# Altium PCB OFP_USM_v1.5.PcbDoc
Units mm, origin at the board's own origin, x right, y up, seen from the top; angles counter-clockwise.
Board outline 45 x 22 mm, 2 copper layers (Top Layer, Bottom Layer), stack 1.57 mm thick; 18 components, 14 nets, 76 pads, 37 vias.
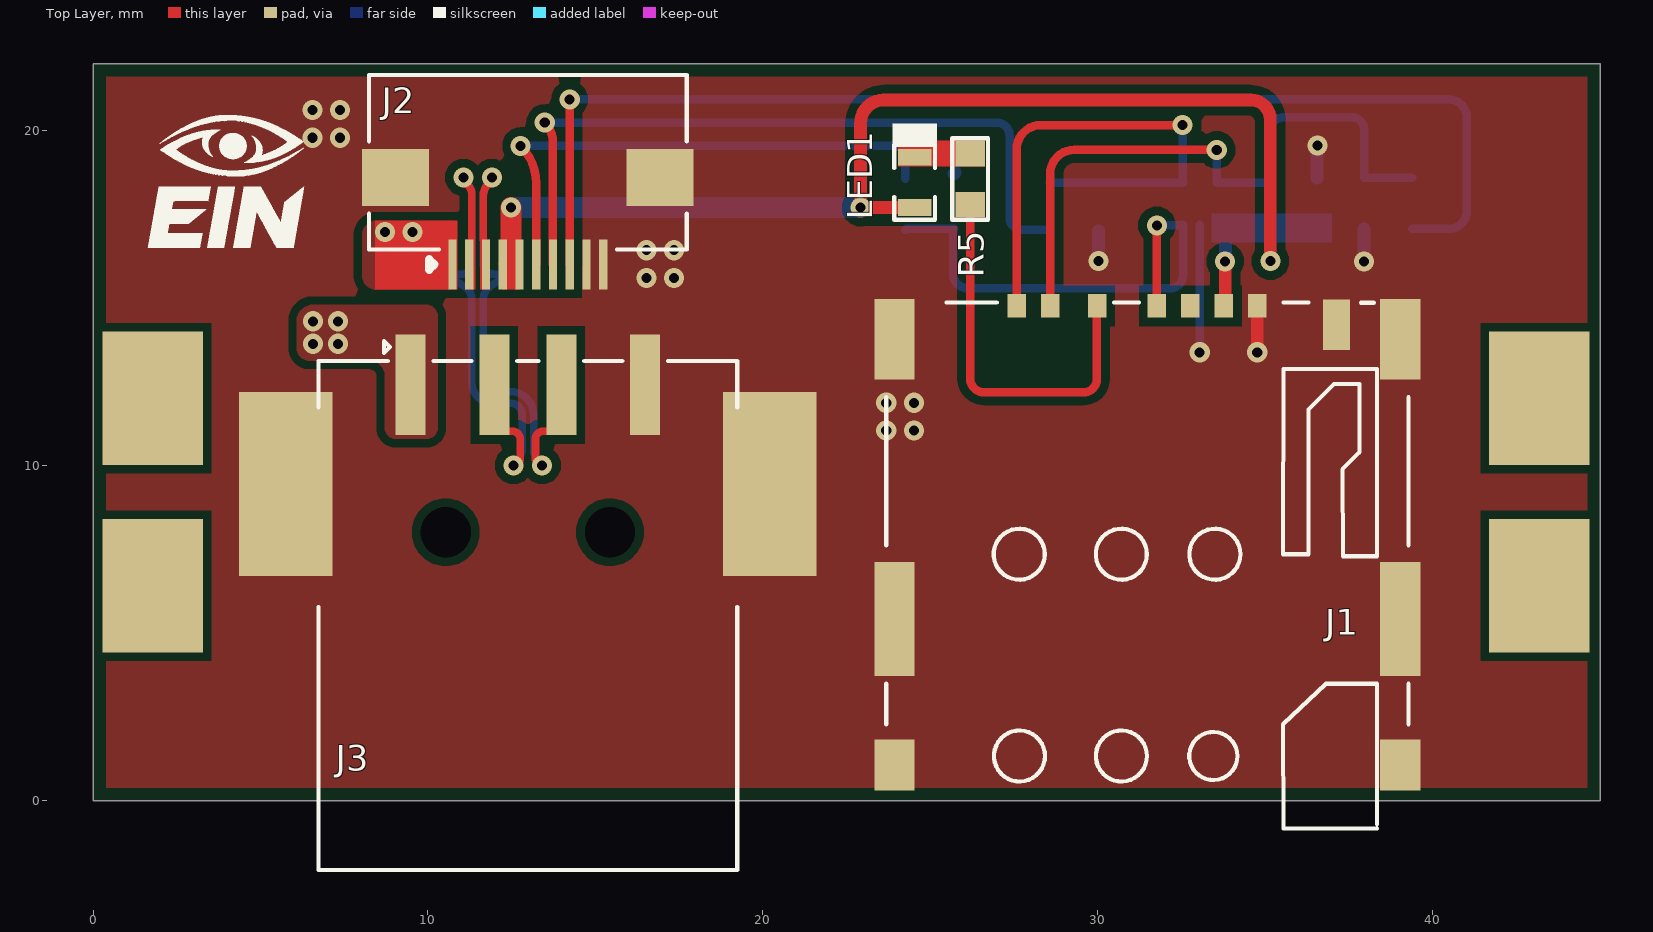
[diagram p0: Top Layer view]
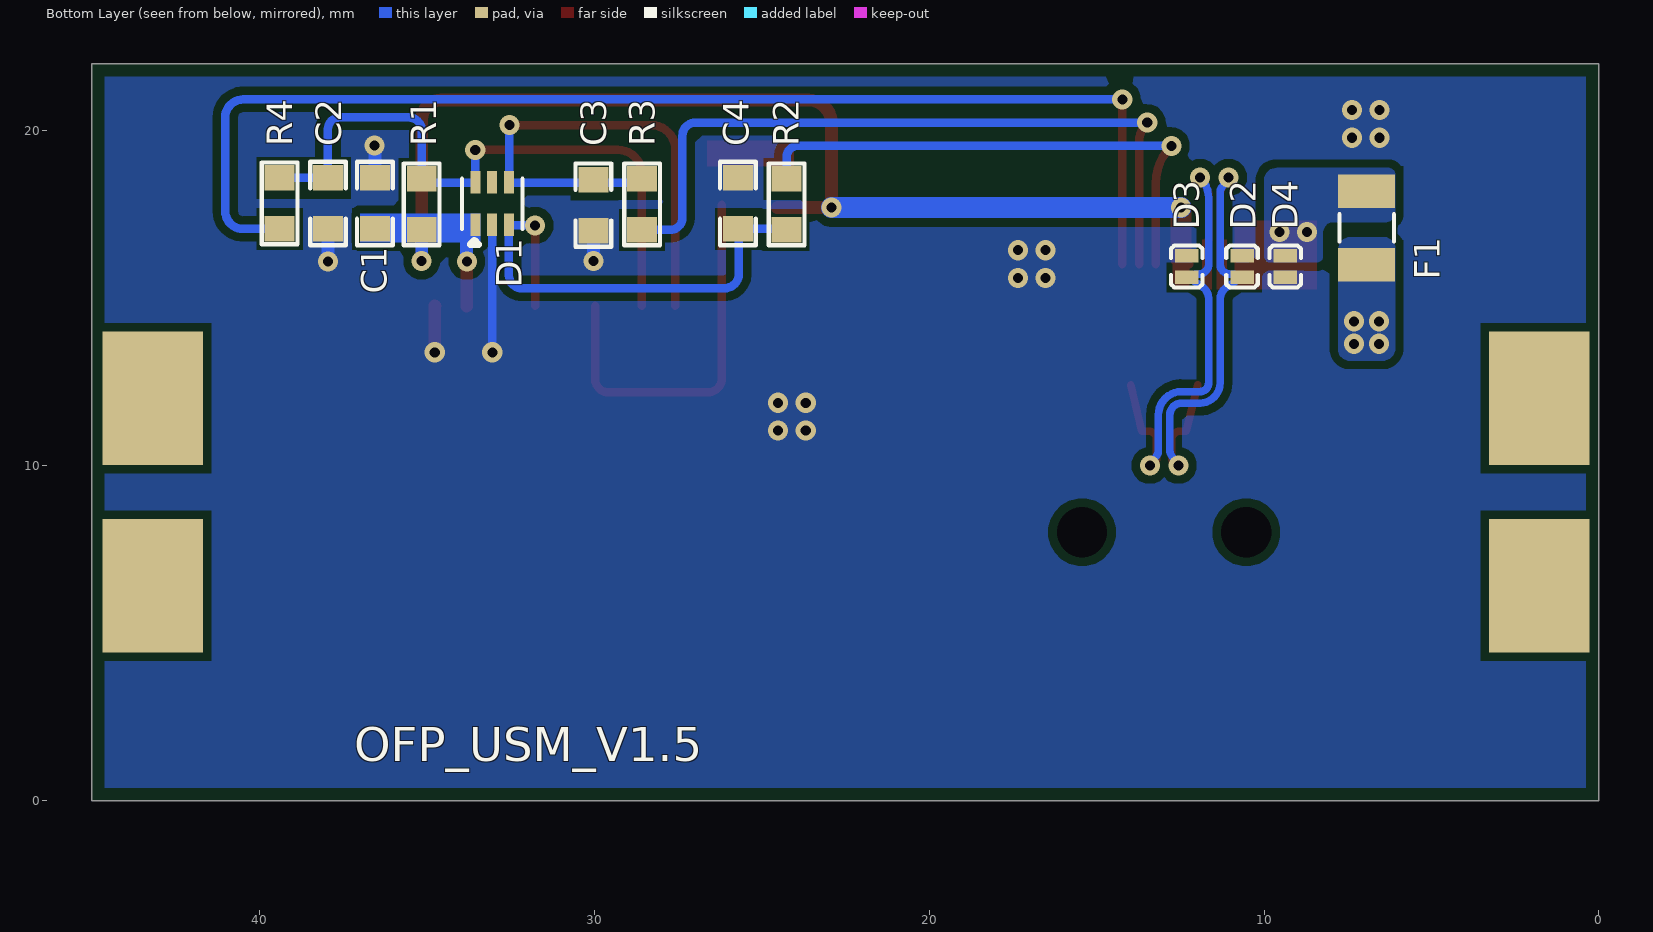
[diagram p1: Bottom Layer view, seen from below]
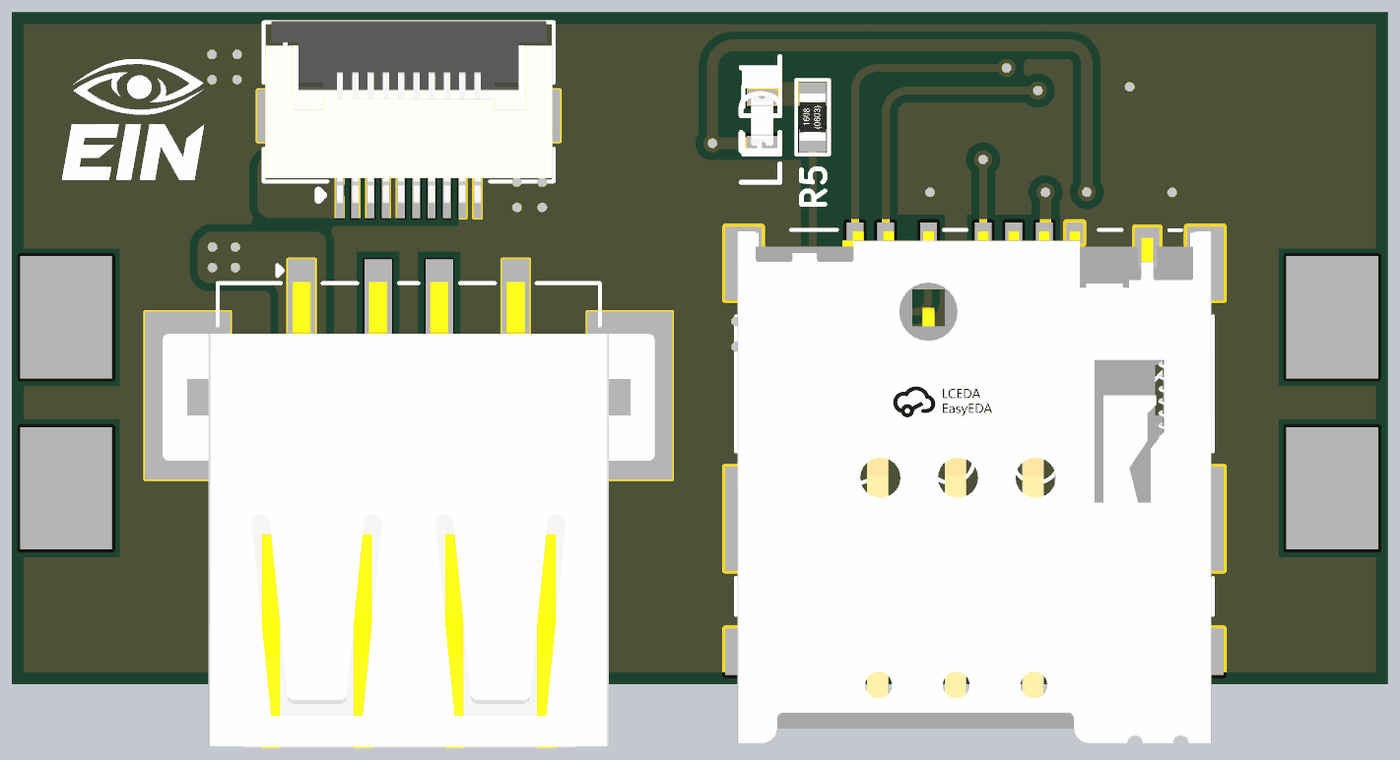
[diagram p2: 3D render of the assembled board from above, using the file's embedded part models]
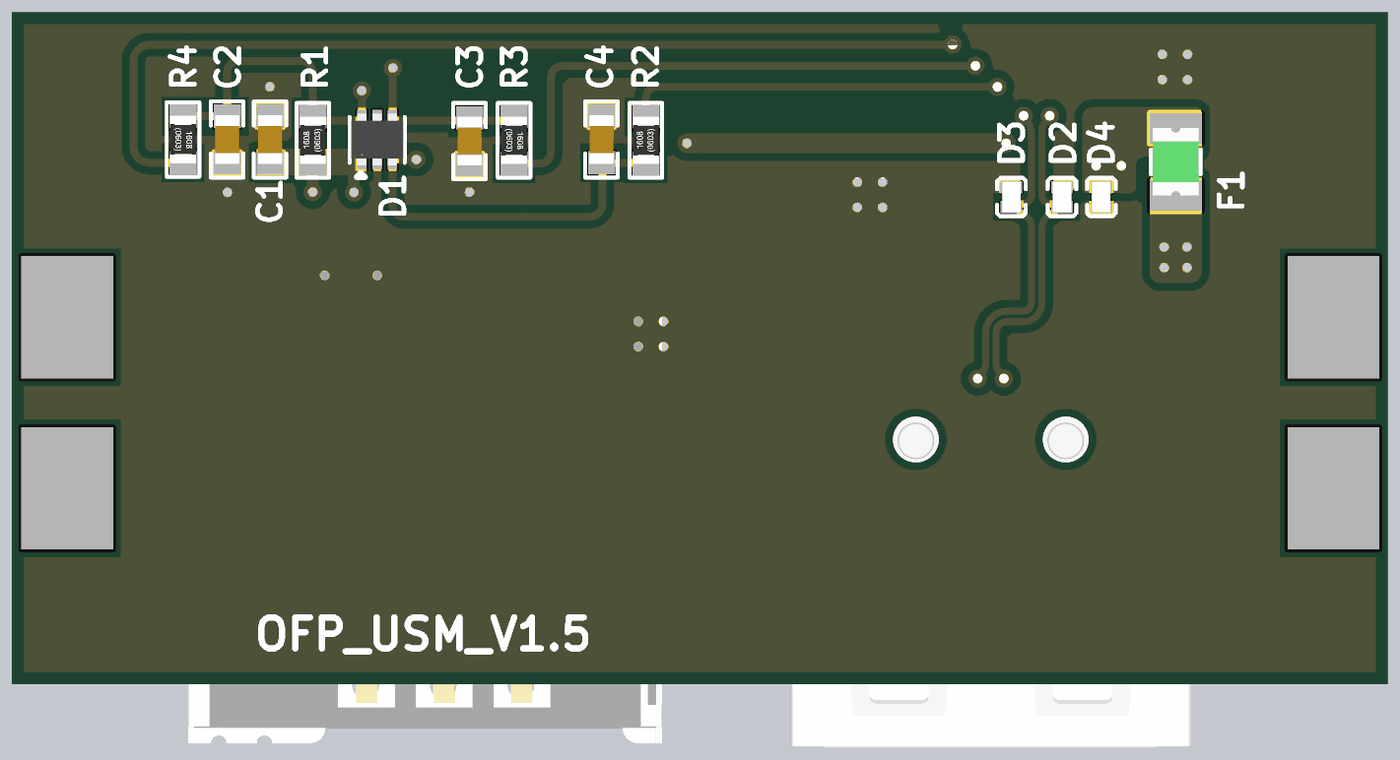
[diagram p3: 3D render of the assembled board from below, using the file's embedded part models]

## Layer stack, top to bottom
Top Solder: solder mask 0.0102, Solder Resist, Dk 3.5
Top Layer: signal copper 0.035
Dielectric 1: dielectric 1.5, FR-4, Dk 4.8
Bottom Layer: signal copper 0.035
Bottom Solder: solder mask 0.0102, Solder Resist, Dk 3.5

## Board outline
0,0 0,22 45,22 45,0

## Design rules (kind name [scope] priority, off if disabled: settings)
BoardOutlineClearance [All] p1: gap=0 ignorepadtopadclearanceinfootprint=FALSE except(0.381: Poly-OutlineEdge)
Clearance DIFF_USB [InDifferentialPairClass('DIFF_USB')] p1: gap=0.254 ignorepadtopadclearanceinfootprint=FALSE except(0.102: Arc-Arc Arc-Track Track-Track; 0.127: Arc-Fill Track-Fill SMDPad-Fill Fill-Fill; 0.152: SMDPad-SMDPad; 0.178: Arc-SMDPad Arc-THPad Track-SMDPad Track-THPad)
Clearance [All] p2: gap=0.254 ignorepadtopadclearanceinfootprint=FALSE except(0.152: SMDPad-SMDPad; 0.178: Arc-Arc Arc-Track Arc-SMDPad Arc-THPad Arc-Fill Track-Track Track-SMDPad Track-THPad Track-Fill SMDPad-Fill Fill-Fill)
ComponentClearance [All] p1: gap=0 collisioncheckmode=3 verticalgap=0 showdistances=FALSE
DiffPairsRouting [InDifferentialPairClass('DIFF_USB')] p1: maxlimit=0.114 minlimit=0.114 mostfreqgap=0.114 toplayer_minwidth=0.229 toplayer_maxwidth=0.229 toplayer_prefwidth=0.229 bottomlayer_minwidth=0.229 bottomlayer_maxwidth=0.229 bottomlayer_prefwidth=0.229 impedanceprofiledriven=TRUE impedanceprofileid={3366D138-F6F0-4418-872E-3D7843BC3837} impedanceprofilevalue=90.000000 maxuncoupledlength=12.7
HoleSize [All] p1: absolutevalues=TRUE maxlimit=25.4 minlimit=0.025 maxpercent=80.000 minpercent=20.000
HoleToHoleClearance [All] p1: gap=0 allowstackedmicrovias=TRUE
MinimumSolderMaskSliver [All] p1: minsoldermaskwidth=0
PolygonConnect [All] p1: connectstyle=Direct reliefconductorwidth=0.254 reliefentries=4 polygonreliefangle="90 Angle" airgapwidth=0.254
RoutingVias [All] p1: holewidth=0.3 width=0.6 viastyle="Through Hole" minholewidth=0.3 minwidth=0.6 maxholewidth=0.7 maxwidth=1.2
ShortCircuit "ShortCircuit - No NET" [InNet('No Net')] p1: allowed=TRUE
SilkToSilkClearance [All] p1: silktosilkclearance=0
SilkToSolderMaskClearance [IsPad] p1: minsilkscreentomaskgap=0 clearancetoexposedcopper=TRUE
SolderMaskExpansion [All] p1: expansion=0.102 istentingtop=FALSE
SupplyNets "Schematic Supply Nets" [InNet('+USIM')] p1: voltage=0.000
SupplyNets "Schematic Supply Nets_45" [InNet('GND')] p2: voltage=0.000
SupplyNets "Schematic Supply Nets_42" [InNet('+5V')] p3: voltage=0.000
Width [All] p1: maxlimit=2.54 minlimit=0.203 preferedwidth=0.381 minimp=50.000000 maximp=50.000000 favimp=50.000000
22 further rules are at their usual default settings.

## Classes and differential pairs
differential pair class DIFF_USB: USB-D
component class USB-SIM-Connector-Sheet: C1 C2 C3 C4 D1 D2 D3 D4 F1 J2 J3 LED1 R1 R2 R3 R4 R5
differential pair USB-D: +USB-D_P -USB-D_N

## Components (designator, comment, footprint, x,y, rotation, side; value= is the part's Value field where it differs from the comment)
C1 "0.1uF" Cap-0603 36.551,17.83 r270 bottom value=100nF
C2 "33pF" Cap-0603 37.951,17.83 r90 bottom
C3 "33pF" Cap-0603 30.025,17.78 r90 bottom
C4 "33pF" Cap-0603 25.711,17.83 r270 bottom
D1 "ESDA6V8AV6" SOT-563 33.047,17.827 r90 bottom
D2 "ESD9B5VL" "DFN1006-2L (Bi-Directional)" 10.657,15.947 r270 bottom
D3 "ESD9B5VL" "DFN1006-2L (Bi-Directional)" 12.309,15.947 r270 bottom
D4 "SLESD5451X" "DFN1006-2L (Bi-Directional)" 9.367,15.947 r90 bottom
F1 "SMD0805B035TF" Fuse-0805 6.934,17.099 r90 bottom
J1 "503960-0696" 5039600696 31.483,7.449 r180 top locked
J2 "HX0.5-10P XJH2.0 043" "HX0.5-10P XJH2.0 043" 12.983,17.308 r180 top
J3 "USB-234-BCW" USB-234-BCW 12.983,10.214 r0 top locked
LED1 "RED" LED-0603 24.533,18.458 r90 top
R1 "15K" Res-0603 35.154,17.805 r270 bottom value=15kR
R2 "22R" Res-0603 24.259,17.805 r270 bottom
R3 "22R" Res-0603 28.573,17.805 r90 bottom
R4 "22R" Res-0603 39.395,17.83 r90 bottom
R5 "680R" Res-0603 26.191,18.56 r270 top

## Footprints (in the part's own frame and the unit in brackets; to place one, negate y for a bottom-side part, rotate by r counter-clockwise, add the part's x,y. Pads: shape width x height; smd on the part's side, far side on the other; paste and mask are expansions set on the pad)
5039600696 [mm]
  rect 0.55x0.7 smd: C1(-2.285,-7.322) C2(-0.285,-7.322) C3(3.905,-7.322) C4(1.5,-7.322) C5(-3.28,-7.322) C6(-1.285,-7.322) C7(2.905,-7.322)
  rect 0.8x1.5 smd: C8(-5.65,-6.757)
  rect 1.2x1.524 smd: C9(-7.55,6.382) C9(7.55,6.382)
  rect 1.2x3.4 smd: C9(-7.55,2.022) C9(7.55,2.022)
  rect 1.2x2.4 smd: C9(-7.55,-6.328) C9(7.55,-6.328)
  silkscreen extent -7.8,-7.43 7.8,8.28, body extent -7.75,-7.37 7.75,9.38, height 1.45
Cap-0603 [mil]
  rect 30x35 smd mask+2.36: 1(-30,0) 2(30,0)
  silkscreen extent -49,-21 49,21, body extent -32,-16 31,16, height 34
"DFN1006-2L (Bi-Directional)" [mm]
  rect 0.4x0.7 smd paste+0 mask+0.051: 1(-0.325,0) 2(0.325,0)
  silkscreen extent -0.63,-0.47 0.63,0.47, body extent -0.5,-0.3 0.5,0.3, height 0.47
Fuse-0805 [mm]
  rect 1x1.7 smd: 1(-1.1,0) 2(1.1,0)
  silkscreen extent -0.41,-0.81 0.41,0.81, body extent -1.1,-0.75 1.1,0.75, height 1.24
"HX0.5-10P XJH2.0 043" [mm]
  rect 0.25x1.5 smd paste+0 mask+0.051: 1(2.25,1.3) 2(1.75,1.3) 3(1.25,1.3) 4(0.75,1.3) 5(0.25,1.3) 6(-0.25,1.3) 7(-0.75,1.3) 8(-1.25,1.3) 9(-1.75,1.3) 10(-2.25,1.3)
  rect 2x1.7 smd paste+0 mask+0.051: MP1(-3.95,-1.3) MP2(3.95,-1.3)
  silkscreen extent -4.74,-4.36 4.74,1.45, body extent -4.71,-4.4 4.7,1.6, height 2.02
LED-0603 [mm]
  rect 0.5x1 smd: 1(-0.75,0) 2(0.75,0)
  silkscreen extent -1.12,-0.66 1.75,0.66, body extent -0.82,-0.37 0.82,0.36, height 0.68
Res-0603 [mil]
  rect 30x35 smd: 1(-30,0) 2(30,0)
  silkscreen extent -48,-21 48,21, body extent -31,-17 31,17, height 18
SOT-563 [mm]
  rect 0.67x0.3 smd mask+0.07: 1(-0.638,0.5) 2(-0.638,0) 3(-0.638,-0.5) 4(0.638,-0.5) 5(0.638,0) 6(0.638,0.5)
  silkscreen extent -1.22,-0.9 0.74,0.9, body extent -0.85,-0.85 0.85,0.85, height 0.61
USB-234-BCW [mm]
  rect 0.9x3 smd paste+0 mask+0.051: 1(-3.5,2.2) 2(-1,2.2) 3(1,2.2) 4(3.5,2.2)
  rect 2.794x5.5 smd paste+0 mask+0.051: S1(-7.228,-0.764) S2(7.228,-0.764)
  round 0 hole 1.5 unplated paste-2539.97: ""(-2.45,-2.2) ""(2.45,-2.2)
  silkscreen extent -6.25,-12.29 6.25,3.51, body extent -8.05,-12.29 8.05,2.96, height 6.82

## Part data
C1: library part GCJ188R71H104KA12D, "CAP CER 0.1UF 50V X7R 0603", Case Code (Imperial)=0603, Case Code (Metric)=1608, Dielectric=X7R, LCSC Part Number=C161115, Manufacturer=Murata, Max Operating Temperature=125°C, Min Operating Temperature=-55°C, Package Quantity=1, Ratings=AEC-Q200, Tolerance=10%, Voltage Rating=50V, Case/Package=0603, ComponentLink1Description=https://datasheet.ciiva.com/135/product-135604.pdf?src-supplier=Digikey, ComponentLink1URL=https://datasheet.ciiva.com/135/product-135604.pdf?src-supplier=Digikey, ComponentLink2Description=https://datasheet.ciiva.com/26889/getdatasheetpartid-369886-26889118.pdf?src-supplier=Verical, ComponentLink2URL=https://datasheet.ciiva.com/26889/getdatasheetpartid-369886-26889118.pdf?src-supplier=Verical, ComponentLink3Description=https://datasheet.ciiva.com/135/s0717e-135605.pdf?src-supplier=Digikey, ComponentLink3URL=https://datasheet.ciiva.com/135/s0717e-135605.pdf?src-supplier=Digikey, ComponentLink4Description=https://datasheet.ciiva.com/135/s0717e-135606.pdf?src-supplier=Digikey, ComponentLink4URL=https://datasheet.ciiva.com/135/s0717e-135606.pdf?src-supplier=Digikey, ComponentLink5Description=https://datasheet.ciiva.com/16440/c03e-16440425.pdf?src-supplier=Future+Electronics, ComponentLink5URL=https://datasheet.ciiva.com/16440/c03e-16440425.pdf?src-supplier=Future+Electronics, Construction=Flat, Depth=0.8mm, Features="Soft Termination", Height=0.8mm, Item Type=Capacitors, Lead Free=5697LeadFree, Length=1.6mm, Manufacturer Part Number=GCJ188R71H104KA12D, Material=4241ConductorMaterial, Mounting Technology="Surface Mount", Packaging="Tape and Reel", Pricing="1=0.13, 10=0.056, 50=0.056, 100=0.036, 1000=0.032, 10000=0.02 (USD)", Radiation Hardening=No, RoHS=Yes, RoHS Compliant=Yes, Series=GCJ, Stock=342536, Supplier=Mouser, Termination=SMD/SMT, Thickness=0.035inch, Voltage Rating (DC)=50V, Width=0.031inch
C2 C3 C4: library part GCM1885C2A330JA16D, "CAP CER 33PF 100V C0G/NP0 0603", Case Code (Imperial)=0603, Case Code (Metric)=1608, Dielectric=C0G, LCSC Part Number=C126578, Manufacturer=Murata, Max Operating Temperature=125°C, Min Operating Temperature=-55°C, Package Quantity=1, Ratings=AEC-Q200, Tolerance=5%, Voltage Rating=100V, Case/Package=0603, ComponentLink1Description=https://datasheet.ciiva.com/161/product-161815.pdf?src-supplier=Digikey, ComponentLink1URL=https://datasheet.ciiva.com/161/product-161815.pdf?src-supplier=Digikey, ComponentLink2Description=https://datasheet.ciiva.com/161/product-161814.pdf?src-supplier=Digikey, ComponentLink2URL=https://datasheet.ciiva.com/161/product-161814.pdf?src-supplier=Digikey, ComponentLink3Description=https://datasheet.ciiva.com/161/product-161816.pdf?src-supplier=Digikey, ComponentLink3URL=https://datasheet.ciiva.com/161/product-161816.pdf?src-supplier=Digikey, ComponentLink4Description=https://datasheet.ciiva.com/11606/product-11606732.pdf?src-supplier=Avnet, ComponentLink4URL=https://datasheet.ciiva.com/11606/product-11606732.pdf?src-supplier=Avnet, Construction=Flat, Depth=0.8mm, Height=0.8mm, Item Type=Capacitors, Length=1.6mm, Manufacturer Part Number=GCM1885C2A330JA16D, Mounting Technology="Surface Mount", Packaging="Tape and Reel", Pricing="1=0.1, 10=0.03, 50=0.03, 100=0.022, 1000=0.017, 10000=0.011 (USD)", Radiation Hardening=No, RoHS=Yes, RoHS Compliant=Yes, Series=GCM, Stock=24199, Supplier=Mouser, Termination=SMD/SMT, Thickness=0.035inch, Voltage Rating (DC)=100V, Width=0.031inch
D1: "4A 14V 40W 6V Unidirectional 5V SOT-563 ESD and Surge Protection (TVS/ESD) ROHS", LCSC Part Number=C3021131, Manufacturer="TECH PUBLIC", Package=SOT-563, ComponentLink1Description=LCSC, ComponentLink1URL=https://www.lcsc.com/product-detail/ESD-and-Surge-Protection-TVS-ESD_TECH-PUBLIC-ESDA6V8AV6_C3021131.html?s_z=n_ESDA6V8AV6, Item Type=(TVS/ESD), Manufacturer Part Number=ESDA6V8AV6
D2 D3: "3A 35W 12V 5.6V Bidirectional 5V DFN1006 ESD and Surge Protection (TVS/ESD) ROHS", LCSC Part Number=C2827544, Manufacturer="TECH PUBLIC", Package=DFN1006, ComponentLink1Description=LCSC, ComponentLink1URL=https://www.lcsc.com/product-detail/ESD-and-Surge-Protection-TVS-ESD_TECH-PUBLIC-ESD9B5VL_C2827544.html?s_z=n_ESD9B5VL, Item Type=(TVS/ESD), Manufacturer Part Number=ESD9B5VL
D4: "60W 5.6V Bidirectional 5V DFN1006 ESD and Surge Protection (TVS/ESD) ROHS", LCSC Part Number=C5185982, Manufacturer="Slkor(SLKORMICRO Elec.)", Package=DFN1006, ComponentLink1Description=LCSC, ComponentLink1URL=https://www.lcsc.com/product-detail/ESD-and-Surge-Protection-TVS-ESD_Slkor-SLKORMICRO-Elec-SLESD5451X_C5185982.html?s_z=n_SLESD5451X, Item Type=TVS/ESD, Manufacturer Part Number=SLESD5451X
F1: "6V 350mA 100A 750mA 0805 Resettable Fuses ROHS", LCSC Part Number=C269103, Manufacturer=Brightking, Package=0805, ComponentLink1Description=LCSC, ComponentLink1URL=https://www.lcsc.com/product-detail/Resettable-Fuses_Brightking-SMD0805B035TF_C269103.html?s_z=n_SMD0805B035TF, Item Type="Resettable Fuses", Manufacturer Part Number=SMD0805B035TF
J1: "CONN MICRO SIMM PUSH-PUSH R/A", Current Rating=500mA, LCSC Part Number=C132719, Manufacturer=Molex, Max Operating Temperature=85°C, Min Operating Temperature=-25°C, Voltage Rating=10V, ComponentLink1Description=http://datasheet.octopart.com/5039600696-Molex-datasheet-148167723.pdf?src-supplier=Rs, ComponentLink1URL=http://datasheet.octopart.com/5039600696-Molex-datasheet-148167723.pdf?src-supplier=Rs, ComponentLink2Description=http://datasheet.octopart.com/5039600696-Molex-datasheet-148167723.pdf?src-supplier=Farnell, ComponentLink2URL=http://datasheet.octopart.com/5039600696-Molex-datasheet-148167723.pdf?src-supplier=Farnell, ComponentLink3Description=http://datasheet.octopart.com/5039600696-Molex-datasheet-148167723.pdf?src-supplier=Avnet, ComponentLink3URL=http://datasheet.octopart.com/5039600696-Molex-datasheet-148167723.pdf?src-supplier=Avnet, ComponentLink4Description=http://datasheet.octopart.com/5039600696-Molex-datasheet-148167723.pdf?src-supplier=Arrow+Electronics, ComponentLink4URL=http://datasheet.octopart.com/5039600696-Molex-datasheet-148167723.pdf?src-supplier=Arrow+Electronics, ComponentLink5Description=http://datasheet.octopart.com/5039600696-Molex-datasheet-148167723.pdf?src-supplier=Onlinecomponents.com, ComponentLink5URL=http://datasheet.octopart.com/5039600696-Molex-datasheet-148167723.pdf?src-supplier=Onlinecomponents.com, ComponentLink6Description=http://datasheet.octopart.com/5039600696-Molex-datasheet-148167723.pdf?src-supplier=Verical, ComponentLink6URL=http://datasheet.octopart.com/5039600696-Molex-datasheet-148167723.pdf?src-supplier=Verical, ComponentLink7Description=http://datasheet.octopart.com/5039600696-Molex-datasheet-148167723.pdf?src-supplier=Electro+Sonic, ComponentLink7URL=http://datasheet.octopart.com/5039600696-Molex-datasheet-148167723.pdf?src-supplier=Electro+Sonic, Contact Material=Nickel,Gold, Contact Plating=Gold, Height=1.5mm, Housing Material="Stainless Steel", Item Type="Memory Connectors", Manufacturer Part Number=503960-0696, Number of Circuits=6, Number of Contacts=8, Plating=Gold, Pricing="1=1.7339, 10=1.4783, 25=1.4697, 50=1.441, 100=1.3312, 250=1.3227, 500=1.2003, 1600=1.1948, 3200=1.1943 (USD)", RoHS=Yes, RoHS Compliant=Yes, Stock=4105, Supplier="Arrow Electronics"
J2: "Flip type 10P Bottom Contact Horizontal attachment 0.5mm SMD,P=0.5mm FFC, FPC (Flat Flexible) Connector Assemblies ROHS", LCSC Part Number=C5691101, Manufacturer=hanxia, Package=SMD,P=0.5mm, ComponentLink1Description=LCSC, ComponentLink1URL=https://www.lcsc.com/product-detail/FFC-FPC-Flat-Flexible-Connector-Assemblies_hanxia-HX0-5-10P-XJH2-0-043_C5691101.html?s_z=n_HX0.5-10P%20XJH2.0%20043, Item Type="FFC/FPC Cable", Manufacturer Part Number="HX0.5-10P XJH2.0 043"
J3: "1.5A USB 2.0 1 Horizontal attachment 4P Female -20℃~+70℃ Type-A SMD USB Connectors ROHS", LCSC Part Number=C720528, Manufacturer=XUNPU, Package=SMD, ComponentLink1Description=LCSC, ComponentLink1URL=https://www.lcsc.com/product-detail/USB-Connectors_XUNPU-USB-234-BCW_C720528.html?s_z=n_USB-234-BCW, Item Type="USB Connector", Manufacturer Part Number=USB-234-BCW
LED1: library part NCD0603R3, "RED LED 0603 Light Emitting Diodes", LCSC Part Number=C3151730, Manufacturer="Foshan NationStar Optoelectronics", Package=0603, ComponentLink1Description=LCSC, ComponentLink1URL=https://www.lcsc.com/product-detail/Light-Emitting-Diodes-LED_Foshan-NationStar-Optoelectronics-NCD0603R3_C3151730.html, Item Type=LED, Manufacturer Part Number=NCD0603R3
R1: library part RC0603FR-0715KL, "RES 15K OHM 1% 1/10W 0603", Case Code (Imperial)=0603, Case Code (Metric)=1608, LCSC Part Number=C114661, Manufacturer=Yageo, Max Operating Temperature=155°C, Max Power Dissipation=100mW, Min Operating Temperature=-55°C, Package Quantity=1, Resistance Tolerance=1%, Resistor Type="Thick Film", Supplier Part Number 1=4083945, Temperature Coefficient=100ppm/°C, Voltage Rating=50V, Case/Package=0603, Category="Chip SMD Resistors", Construction=Rectangular, Depth=0.8mm, Features="Moisture Resistant", Height=0.022inch, Item Type=Resistor, Lead Free="Lead Free", Length=0.063inch, Manufacturer Part Number=RC0603FR-0715KL, Military Standard=Not, Number of Terminations=2, Packaging="Tape and Reel", Pins=2, Power Rating=100mW, Pricing 1="5000=0.00150, 50000=0.00140, 100000=0.00140, 200000=0.00140, 375000=0.00140, 625000=0.00130, 1000000=0.00130, 2000000=0.00120, 3750000=0.00120 (USD)", RoHS=Yes, RoHS Compliant=Yes, Series=RC, Stock 1=13310000, Supplier 1="Future Electronics", Termination=SMD/SMT, Tolerance=1%, Voltage Rating (DC)=50V, Width=0.031inch
R2 R3 R4: library part RC0603FR-0722RL, "RES 22 OHM 1% 1/10W 0603", Case Code (Imperial)=0603, Case Code (Metric)=1608, LCSC Part Number=C107701, Manufacturer=Yageo, Max Operating Temperature=155°C, Max Power Dissipation=100mW, Min Operating Temperature=-55°C, Package Quantity=1, Resistance Tolerance=1%, Resistor Type="Thick Film", Temperature Coefficient=100ppm/°C, Voltage Rating=50V, Case/Package=0603, Category="Chip SMD Resistors", ComponentLink1Description=https://datasheet.ciiva.com/11819/0900766b80f96399-11819285.pdf?src-supplier=RSComponents, ComponentLink1URL=https://datasheet.ciiva.com/11819/0900766b80f96399-11819285.pdf?src-supplier=RSComponents, ComponentLink2Description=https://datasheet.ciiva.com/46395/443971-46395032.pdf?src-supplier=Element14, ComponentLink2URL=https://datasheet.ciiva.com/46395/443971-46395032.pdf?src-supplier=Element14, ComponentLink3Description=https://datasheet.ciiva.com/46440/1868787-46440901.pdf?src-supplier=Element14, ComponentLink3URL=https://datasheet.ciiva.com/46440/1868787-46440901.pdf?src-supplier=Element14, ComponentLink4Description=https://datasheet.ciiva.com/2454/pyu-r-int-thick-7-2454355.pdf?src-supplier=Digi-Key, ComponentLink4URL=https://datasheet.ciiva.com/2454/pyu-r-int-thick-7-2454355.pdf?src-supplier=Digi-Key, ComponentLink5Description=https://datasheet.ciiva.com/2454/pyu-r-int-thick-7-2454356.pdf?src-supplier=Digi-Key, ComponentLink5URL=https://datasheet.ciiva.com/2454/pyu-r-int-thick-7-2454356.pdf?src-supplier=Digi-Key, ComponentLink6Description=https://datasheet.ciiva.com/2454/pyu-r-int-thick-7-2454354.pdf?src-supplier=Digi-Key, ComponentLink6URL=https://datasheet.ciiva.com/2454/pyu-r-int-thick-7-2454354.pdf?src-supplier=Digi-Key, Construction=Rectangular, Depth=0.8mm, Features="Moisture Resistant", Height=0.022inch, Item Type=Resistor, Lead Free="Lead Free", Length=0.063inch, Manufacturer Part Number=RC0603FR-0722RL, Military Standard=Not, Number of Pins=2, Number of Terminations=2, Packaging="Tape and Reel", Power Rating=100mW, Pricing 1="5000=0.00133, 10000=0.00131, 20000=0.00127 (USD)", Reach SVHC Compliant=Yes, Resistance=22R, RoHS=Yes, RoHS Compliant=Yes, Series=RC, Size Code=0603, Stock 1=190000, Supplier 1=Avnet, Supplier Part Number 1=RC0603FR-0722RL, Technology="THICK FILM", Termination=SMD/SMT, Tolerance=1%, Voltage Rating (DC)=50V, Width=0.031inch
R5: library part RC0603FR-07680RL, "RES SMD 680 OHM 1% 1/10W 0603", LCSC Part Number=C112310, Manufacturer=Yageo, Package=0603, ComponentLink4Description=LCSC, ComponentLink4URL=https://www.lcsc.com/product-detail/Chip-Resistor-Surface-Mount_YAGEO-RC0603FR-07680RL_C112310.html, Item Type=Resistor, Manufacturer Part Number=RC0603FR-07680RL

## Free pads (board coordinates)
  rect 3x4 smd: MH1(1.783,6.414) MH2(1.783,12.014) MH3(43.183,12.014) MH4(43.183,6.414)
  rect 3x4 smd far side: MH1(1.783,6.414) MH2(1.783,12.014) MH3(43.183,12.014) MH4(43.183,6.414)

## Via types
v1: diameter 0.6, hole 0.3, Top Layer to Bottom Layer, tented both sides, 37 vias

## Nets (pads, with @x,y where several pads share a name; then routed paths per layer and width w, separated by ;. In a path a pad name is that pad's centre, name@x,y a point inside that pad or via, vN(x,y) a via of type N, cw(c..) or ccw(c..) an arc to the next point about the centre after c; other vN are vias at no path point)
+5V: D4.2 F1.2 J2.1 | length 0
  Top Layer w0.305: J2.1 J2.1@10.733,16.039
  other v1: 8.715,16.972 9.539,16.972
+USIM: C1.2 D1.1 J1.C1 J2.4 J2.5 LED1.1 R1.2 | length 39.2
  Top Layer w0.254: 12.402,16.092 12.494,16.184
  Top Layer w0.381: LED1.1 v1(22.919,17.708) 22.919,20.23 cw(c23.608,20.23) 23.608,20.919 34.574,20.919 cw(c34.574,20.339) 35.154,20.339 v1(35.154,16.111) ; v1@33.768,16.103 v1@33.768,16.105 ; J1.C1@33.806,14.771 v1(33.806,16.103)
  Top Layer w0.635: 12.482,16.184 v1(12.482,17.708)
  Bottom Layer w0.254: v1@33.772,16.107 33.768,16.103 v1@33.776,16.103
  Bottom Layer w0.381: v1@33.814,16.103 33.814,17.189 ; v1(35.154,16.111) R1.2
  Bottom Layer w0.508: 33.911,17.189 C1.2@36.328,17.189
  Bottom Layer w0.635: v1(12.482,17.708) v1(22.919,17.708)
GND: C1.1 C2.1 C3.1 C4.1 D1.2 D2.1 D3.1 D4.1 J1.C5 J1.C8 J1.C9 J2.9 J2.10 J2.MP1 J2.MP2 J3.4 J3.S1 J3.S2 | length 8.1
  Top Layer w0.381: J1.C5@34.757,14.765 J1.C5 v1(34.763,13.386)
  Bottom Layer w0.254: v1(33.045,13.386) 33.047,13.386 D1.2 ; C1.1@36.551,18.578 C1.1
  Bottom Layer w0.381: C4.1@25.711,18.721 C4.1@25.746,18.756 ; v1(30.025,16.107) C3.1 ; C1.1 v1@36.551,19.558 ; v1@37.951,16.103 C2.1
  other v1: 23.685,11.054 24.509,11.054 23.685,11.878 24.509,11.878 16.524,15.61 17.348,15.61 37.945,16.103 16.524,16.434 17.348,16.434 36.557,19.558 6.551,19.792 7.375,19.792 6.551,20.616 7.375,20.616
NetC2_2: C2.2 D1.6 J1.C7 R1.1 R4.2 | length 19.4
  Top Layer w0.254: J1.C7 28.578,18.71 cw(c29.299,18.71) 29.299,19.431 v1(33.553,19.431)
  Bottom Layer w0.254: v1@33.547,19.431 D1.6 33.547,18.451 R1.1@35.067,18.451 ; R1.1 35.154,20.016 cw(c35.538,20.016) 35.538,20.4 37.608,20.4 cw(c37.608,20.056) 37.951,20.056 C2.2@37.951,18.618 ; C2.2 R4.2
NetC3_2: C3.2 D1.4 J1.C3 R3.2 | length 15.7
  Top Layer w0.254: J1.C3 27.578,19.446 cw(c28.303,19.446) 27.727,19.887 cw(c28.303,19.446) 27.863,20.022 cw(c28.303,19.446) 28.303,20.171 v1(32.533,20.171)
  Bottom Layer w0.254: R3.2@28.573,18.451 D1.4@32.533,18.451 ; v1(32.533,20.171) 32.54,20.164 32.54,18.472 D1.4 D1.4@32.533,18.451 ; D1.4@32.547,18.451 D1.4@32.533,18.451
NetC4_2: C4.2 D1.3 J1.C2 R2.2 | length 14.8
  Top Layer w0.254: J1.C2 v1(31.768,17.176)
  Bottom Layer w0.254: R2.2 cw(c24.285,17.043) 24.285,17.068 25.679,17.068 C4.2 ccw(c25.711,17.037) 25.679,17.037 25.679,15.731 ccw(c26.111,15.731) 26.111,15.3 32.17,15.3 ccw(c32.17,15.677) 32.547,15.677 D1.3 ; v1@31.775,17.183 D1.3@32.493,17.183
NetF1_1: F1.1 J3.1
  other v1: 6.567,13.64 7.315,13.64 6.567,14.311 7.315,14.311
NetJ1_C4: J1.C4 R5.2 | length 11.6
  Top Layer w0.254: R5.2 26.191,12.607 ccw(c26.606,12.607) 26.606,12.192 29.583,12.192 ccw(c29.583,12.581) 29.972,12.581 J1.C4@29.972,14.771
NetLED1_2: LED1.2 R5.1
USB-D_N: D2.2 J2.2 J3.2 | length 16
  Top Layer w0.229: v1(11.056,18.608) ccw(c11.276,18.608) 11.12,18.452 11.184,18.389 cw(c10.875,18.08) 11.311,18.08 11.311,16.767 cw(c11.177,16.767) 11.272,16.672 ccw(c11.367,16.577) 11.233,16.577 J2.2 ; J3.2 12.319,11.028 12.527,11.028 cw(c12.527,10.8) 12.755,10.8 12.755,10.207 cw(c12.556,10.207) v1(12.556,10.008)
  Bottom Layer w0.229: D2.2@10.657,15.629 10.76,15.562 11.104,15.34 cw(c10.856,14.957) 11.311,14.986 11.311,14.895 11.311,12.47 ccw(c11.912,12.47) 11.912,11.869 12.46,11.869 cw(c12.46,11.517) 12.811,11.517 12.811,11.375 12.811,10.446 cw(c12.583,10.446) 12.77,10.316 v1(12.556,10.008) ; D2.2@10.892,15.714 11.054,15.724 ccw(c11.015,16.02) 11.311,15.982 11.311,16.002 11.311,18.169 ccw(c11.083,18.169) 11.27,18.299 v1(11.056,18.608)
USB-D_P: D3.2 J2.3 J3.3 | length 16.2
  Top Layer w0.229: J2.3 11.733,16.577 ccw(c11.599,16.577) 11.694,16.672 cw(c11.788,16.767) 11.654,16.767 11.654,18.08 cw(c12.091,18.08) 11.782,18.389 11.845,18.452 ccw(c11.69,18.608) v1(11.91,18.608) ; v1(13.41,10.008) cw(c13.41,10.207) 13.21,10.207 13.21,10.8 cw(c13.439,10.8) 13.439,11.028 13.647,11.028 J3.3
  Bottom Layer w0.229: 11.654,14.802 11.654,15.004 ; 11.654,15.982 ccw(c11.95,16.02) 11.912,15.724 D3.2@12.073,15.714 ; 11.654,16.002 11.654,17.991 cw(c12.527,17.991) 11.734,18.355 cw(c12.527,17.991) v1(11.91,18.608) ; D3.2@12.309,15.648 12.206,15.581 11.862,15.359 ccw(c12.11,14.976) 11.654,15.004 ; v1(13.41,10.008) 13.195,10.316 cw(c13.383,10.446) 13.154,10.446 13.154,11.233 13.154,11.517 ccw(c12.46,11.517) 12.46,12.212 11.912,12.212 cw(c11.912,12.47) 11.654,12.47 11.654,15.004
USIM_CLK: J2.7 R3.1 | length 22.3
  Top Layer w0.254: v1(13.487,20.244) cw(c12.895,19.651) 13.733,19.651 J2.7
  Bottom Layer w0.254: v1(13.487,20.244) 26.982,20.244 cw(c26.982,19.856) 27.369,19.856 27.369,17.401 ccw(c27.728,17.402) 27.73,17.043 R3.1
USIM_DATA: J2.8 R4.1 | length 36.9
  Top Layer w0.254: J2.8 v1@14.233,21.077
  Bottom Layer w0.254: v1(14.233,20.936) 40.391,20.936 40.485,20.936 cw(c40.485,20.4) 40.639,20.913 cw(c40.485,20.4) 40.998,20.554 cw(c40.485,20.4) 41.021,20.4 41.021,17.605 cw(c40.485,17.605) 40.921,17.293 cw(c40.485,17.605) 40.796,17.168 cw(c40.485,17.605) 40.485,17.068 R4.1 ; v1@14.233,21.077 v1@14.247,21.063
USIM_RST: J2.6 R2.1 | length 16
  Top Layer w0.254: v1(12.767,19.552) cw(c11.643,18.428) 13.233,18.428 J2.6
  Bottom Layer w0.254: v1(12.767,19.552) 23.923,19.552 cw(c23.923,19.216) 24.259,19.216 R2.1
pads on no net: D1.5 J1.C6 J3.

## Polygon pours and split planes (outlines as drawn)
+5V on Top Layer "NONET_L-01_P-001" (solid, pour order 7): 10.886,15.258 8.473,15.258 cw(c8.473,15.697) 8.033,15.697 8.033,16.884 cw(c8.456,16.884) 8.456,17.308 10.865,17.308 ccw(c10.865,17.328) 10.886,17.328
NetF1_1 on Top Layer "NONET_L-01_P-001" (solid, pour order 6): 8.279,13.133 cw(c8.279,12.697) 8.715,12.697 8.715,11.117 ccw(c9.033,11.117) 9.033,10.8 9.961,10.8 ccw(c9.961,11.125) 10.287,11.125 10.287,14.453 ccw(c9.933,14.453) 9.933,14.807 6.582,14.807 ccw(c6.582,14.311) 6.086,14.311 6.086,13.519 ccw(c6.472,13.519) 6.472,13.133
GND on Top Layer "GND_L01_P001" (solid, remove dead copper, pour order 1): 0,22 45,22 45,0 0,0 0,22
+5V on Bottom Layer "NONET_L-01_P-001" (solid, pour order 5): 9.825,16.07 ccw(c9.825,16.241) 9.997,16.241 9.996,17.444 9.996,18.528 ccw(c9.627,18.528) 9.627,18.898 6.309,18.898 ccw(c6.309,18.673) 6.084,18.673 6.084,17.529 ccw(c6.342,17.529) 6.342,17.272 6.121,17.268 7.938,17.268 cw(c7.938,16.967) 8.24,16.967 8.24,16.253 ccw(c8.423,16.253) 8.423,16.07
NetF1_1 on Bottom Layer "NONET_L-01_P-001" (solid, pour order 4): 7.786,13.487 cw(c7.433,13.487) 7.433,13.133 6.471,13.133 cw(c6.471,13.518) 6.086,13.518 6.086,16.497 cw(c6.405,16.497) 6.405,16.816 7.437,16.816 cw(c7.437,16.467) 7.786,16.467
GND on Bottom Layer "GND_L02_P000" (solid, remove dead copper, pour order 0): 0,22 45,22 45,0 0,0 0,22

## Other copper
Top Layer:
  rectangle net +5V: 8.423,15.258 10.886,17.328
  region net USB-D_P: 11.858,16.758 11.553,16.758 11.553,15.258 11.858,15.258
  rectangle net USB-D_N: 11.108,15.258 11.413,16.758
  rectangle net USB-D_N: 11.108,15.258 11.358,16.758
  rectangle net NetLED1_2: 24.033,18.941 26.636,19.703
  rectangle net +USIM: 12.233,15.258 12.733,16.414
  rectangle net +5V: 10.58,15.258 10.886,16.758
  pour cut-out: 25.803,17.232 25.803,17.163 22.919,17.163 22.919,17.232
  pour cut-out: 29.107,15.121 29.107,15.375 29.454,15.375 29.454,15.121
Bottom Layer:
  rectangle net +USIM: 33.397,16.662 34.392,17.524
  rectangle net +USIM: 33.776,16.662 36.995,17.524

## Silkscreen, mask and mechanical layers (free items; w line width, h text height)
Top Overlay:
  drawing of 6 lines, arcs and shapes, not listed
Bottom Overlay:
  text "OFP_USM_V1.5" at 37.167,1.168 h1.02
Board Outline:
  the board outline again, w0.254
Fabrication:
  drawing of 191 lines, arcs and shapes, not listed
  text "Layer" at 61.724,28.981 h1.52
  text "Name" at 72.136,28.981 h1.52
  text "Material" at 95.752,28.981 h1.52
  text "Thickness" at 117.59,28.981 h1.52
  text "Constant" at 134.095,28.981 h1.52
  text "Board Layer Stack" at 148.57,28.981 h1.52
  text "Top Overlay" at 72.136,25.933 h1.52
  text "Top Solder" at 72.136,22.885 h1.52
  text "Solder Resist" at 95.752,22.885 h1.52
  text "0.010mm" at 117.59,22.885 h1.52
  text "3.5" at 134.095,22.885 h1.52
  text "1" at 61.724,19.837 h1.52
  text "Top Layer" at 72.136,19.837 h1.52
  text "0.035mm" at 117.59,19.837 h1.52
  text "Dielectric 1" at 72.136,16.789 h1.52
  text "FR-4" at 95.752,16.789 h1.52
  text "1.500mm" at 117.59,16.789 h1.52
  text "4.8" at 134.095,16.789 h1.52
  text "2" at 61.724,13.741 h1.52
  text "Bottom Layer" at 72.136,13.741 h1.52
  text "0.035mm" at 117.59,13.741 h1.52
  text "Bottom Solder" at 72.136,10.693 h1.52
  text "Solder Resist" at 95.752,10.693 h1.52
  text "0.010mm" at 117.59,10.693 h1.52
  text "3.5" at 134.095,10.693 h1.52
  text "Bottom Overlay" at 72.136,7.645 h1.52
  text "Total board thickness:" at 61.724,4.597 h1.52
  text "1.590mm" at 117.59,4.597 h1.52
Drill Drawing:
  circle w0.254: c1.204,40.648 r0.847
  lines w0.254: 0.357,43.612 2.05,43.612 2.05,45.305 0.357,45.305 0.357,43.612
  lines w0.381: -1.162,38.659 177.911,38.659 ; -1.162,46.279 177.911,46.279 ; 12.831,34.849 12.831,50.089 ; 26.543,34.849 26.543,50.089 ; 54.221,34.849 54.221,50.089 ; 67.07,34.849 67.07,50.089 ; 85.709,34.849 85.709,50.089 ; 123.797,34.849 123.797,50.089 ; 138.779,34.849 138.779,50.089 ; 157.723,34.849 157.723,50.089 ; -1.162,34.849 177.911,34.849 177.911,50.089 -1.162,50.089 -1.162,34.849
  text "Symbol" at 1.124,47.422 h1.83
  text "Count" at 13.974,47.422 h1.83
  text "Hole Size" at 27.686,47.422 h1.83
  text "Plated" at 55.364,47.422 h1.83
  text "Hole Type" at 68.213,47.422 h1.83
  text "Drill Layer Pair" at 86.852,47.422 h1.83
  text "Via/Pad" at 124.94,47.422 h1.83
  text "Pad Shape" at 139.922,47.422 h1.83
  text "Template" at 158.866,47.422 h1.83
  text "2" at 13.974,43.612 h1.52
  text "59.06mil (1.500mm)" at 27.686,43.612 h1.52
  text "NPTH" at 55.364,43.612 h1.52
  text "Round" at 68.213,43.612 h1.52
  text "Top Layer - Bottom Layer" at 86.852,43.612 h1.52
  text "Pad" at 124.94,43.612 h1.52
  text "Rounded" at 139.922,43.612 h1.52
  text "c0hn150p0" at 158.866,43.612 h1.52
  text "37" at 13.974,39.802 h1.52
  text "11.81mil (0.300mm)" at 27.686,39.802 h1.52
  text "PTH" at 55.364,39.802 h1.52
  text "Round" at 68.213,39.802 h1.52
  text "Top Layer - Bottom Layer" at 86.852,39.802 h1.52
  text "Via" at 124.94,39.802 h1.52
  text "Rounded" at 139.922,39.802 h1.52
  text "v60h30m0mx0" at 158.866,39.802 h1.52
  text "39 Total" at 13.974,35.992 h1.52

## Dimensions
45,22 to 45,0 on Dimension
0,22 to 45,22 on Dimension